# Altium PCB PCB_2020-11-19_18-02-21_2026-10-13.pcbdoc (part 1 of 2)
Units mm, origin at the board's own origin, x right, y up, seen from the top; angles counter-clockwise.
Board outline 104.82 x 112.39 mm, 2 copper layers (Top Layer, Bottom Layer); 188 components, 189 nets, 651 pads, 163 vias.
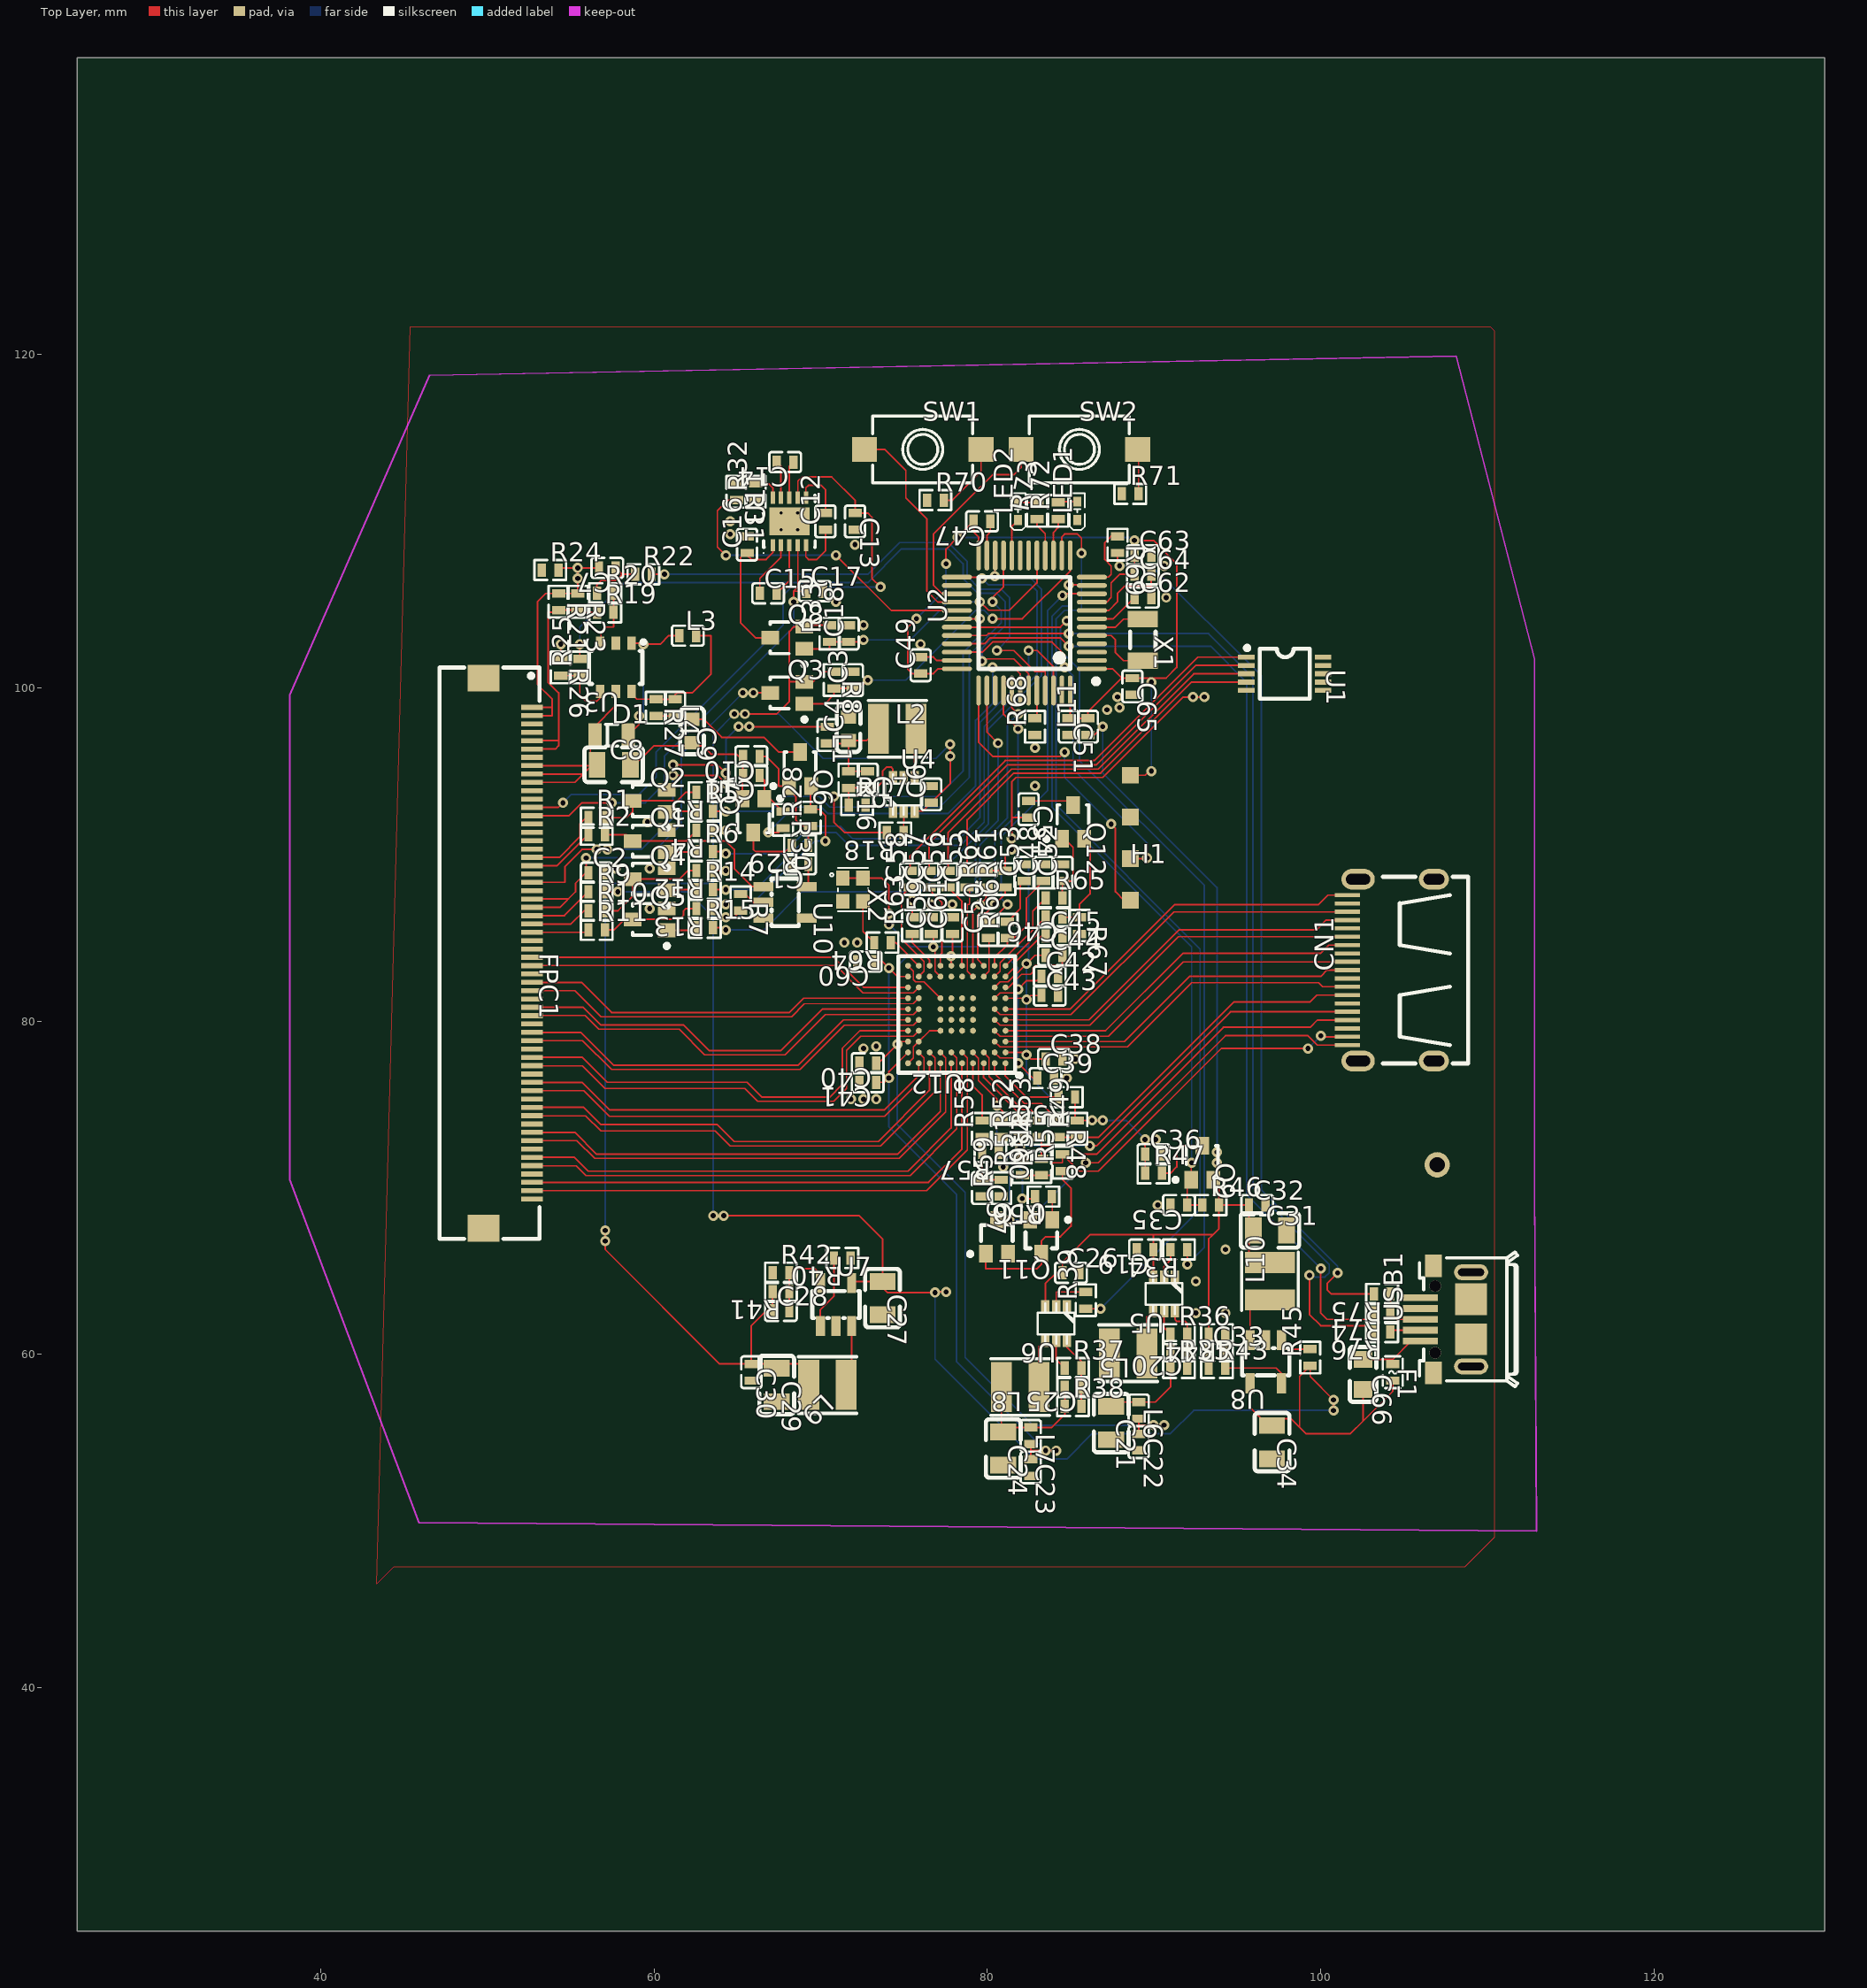
[diagram p0: Top Layer view]
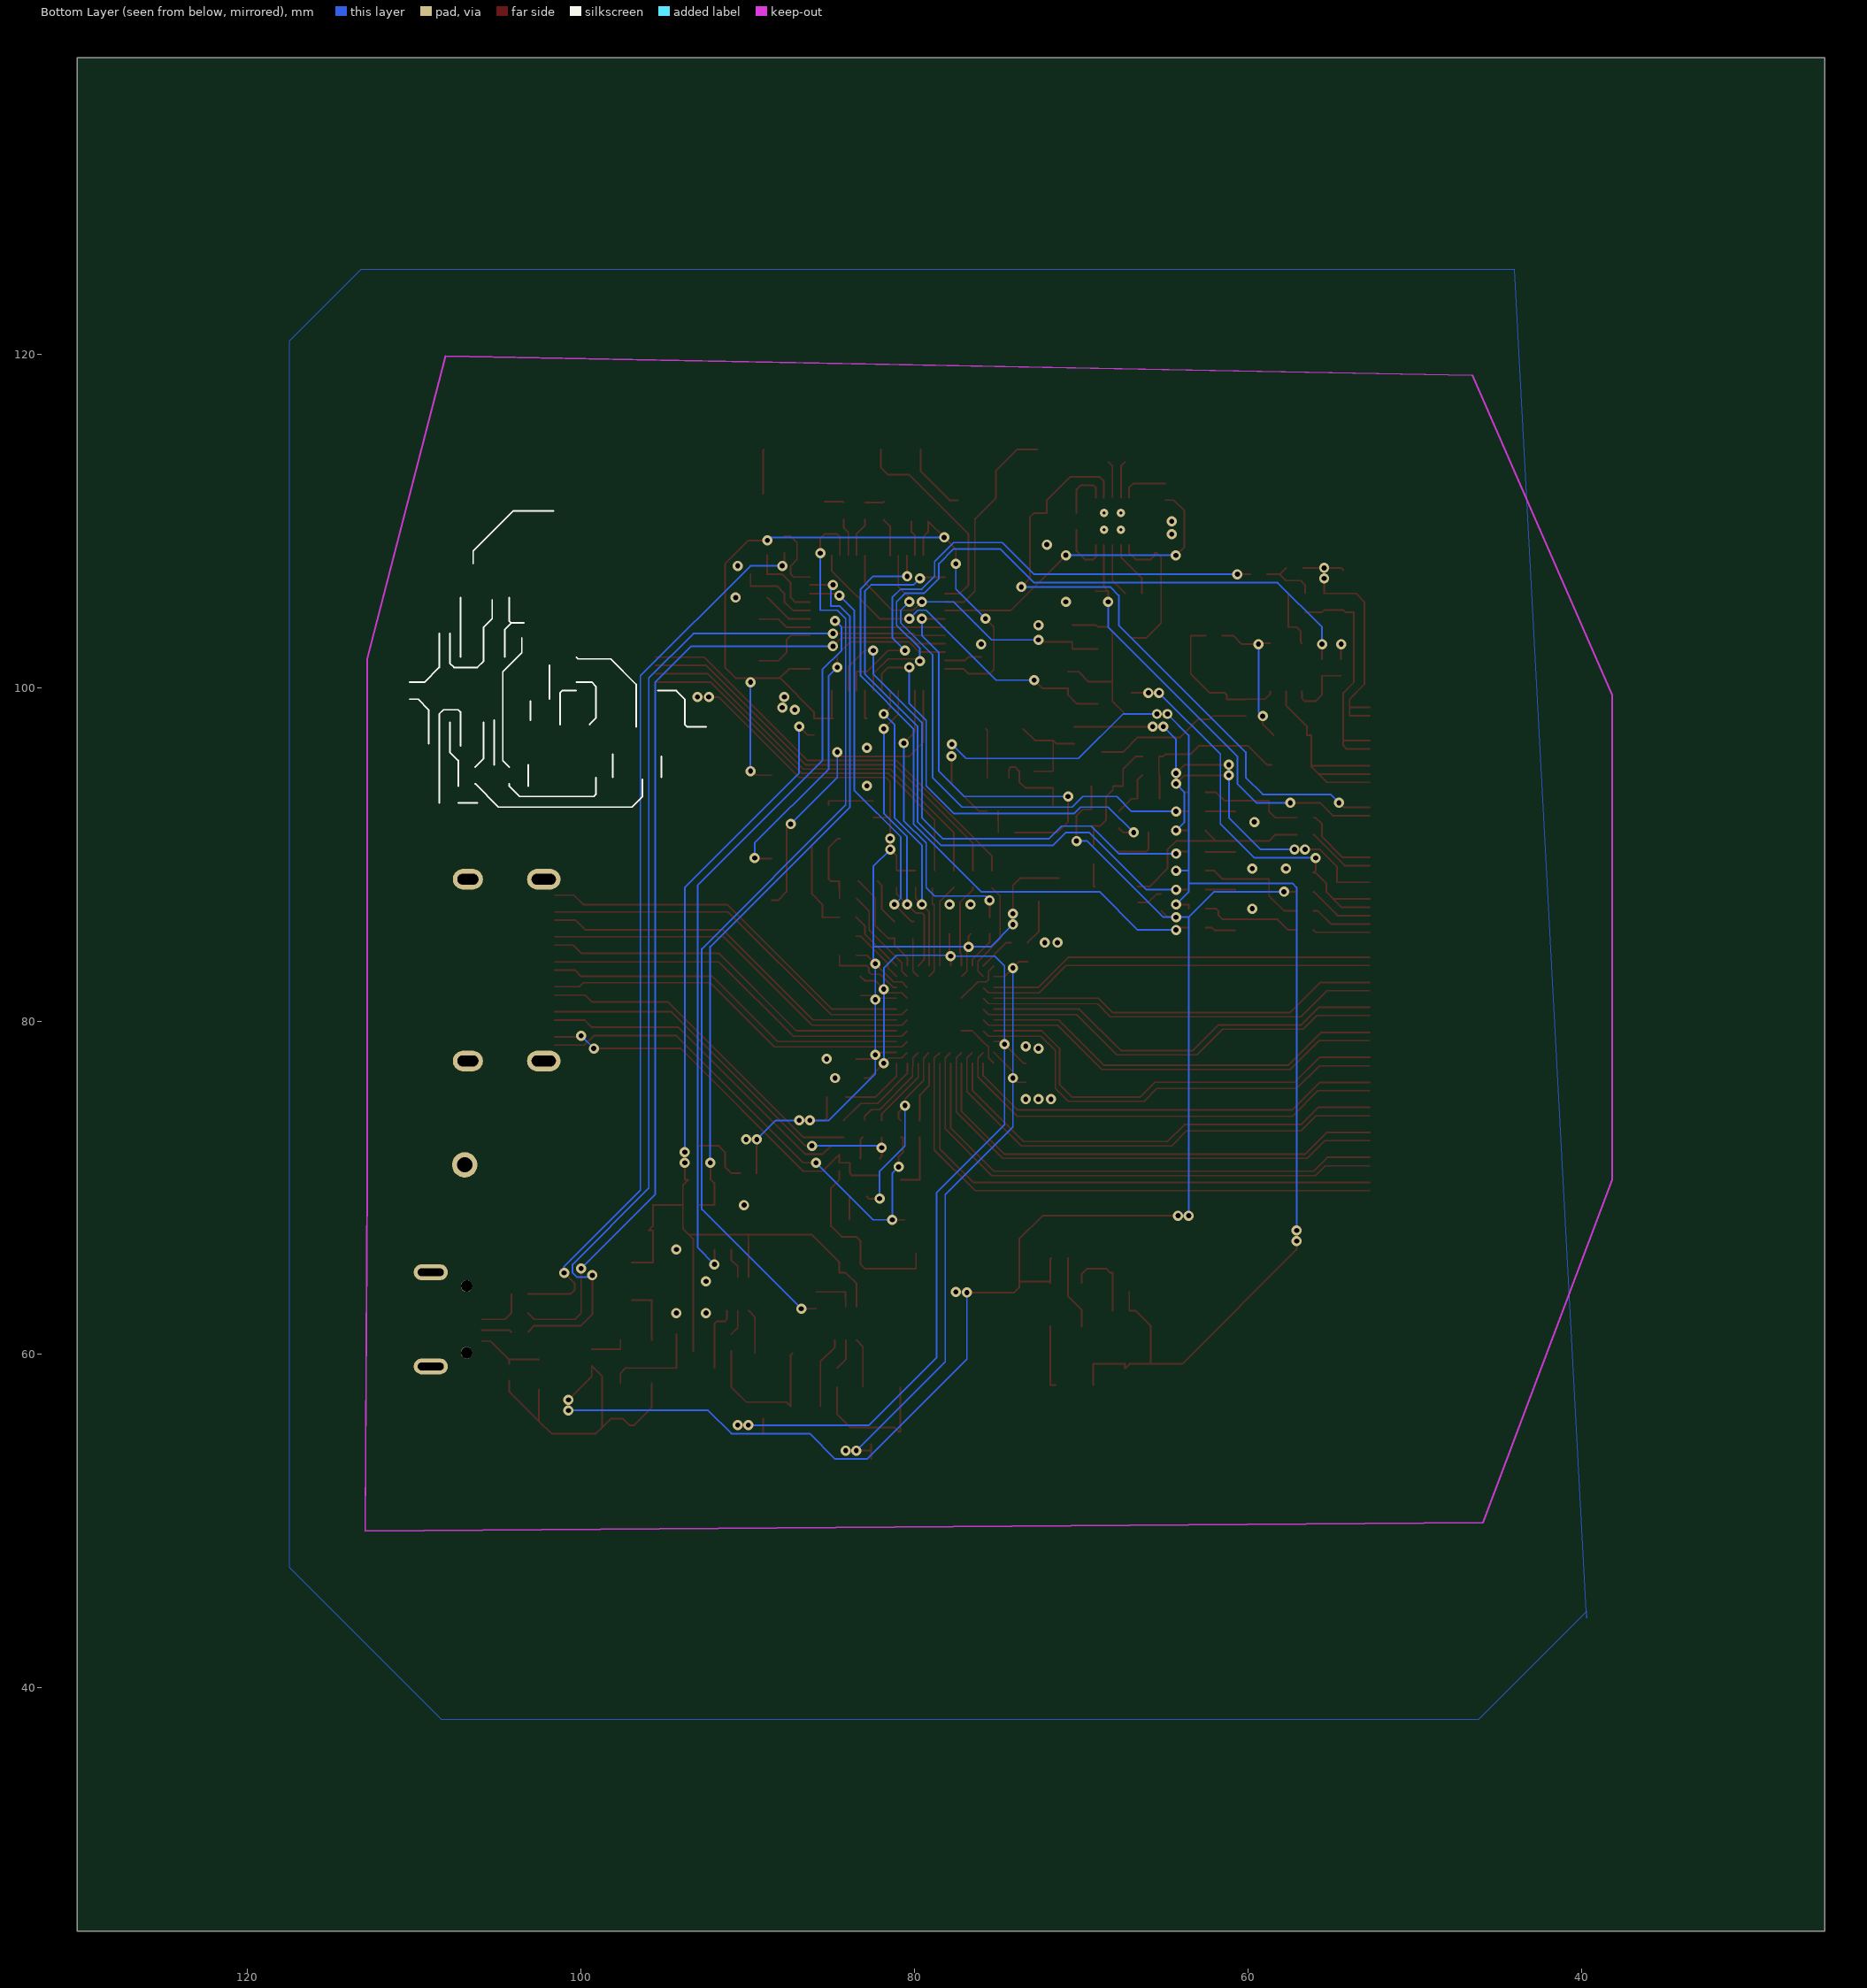
[diagram p1: Bottom Layer view, seen from below]

## Layer stack, top to bottom
Top Layer: signal copper (thickness not stored)
Dielectric: dielectric 0.32, FR-4, Dk 4.8
Bottom Layer: signal copper (thickness not stored)

## Board outline
130.225,25.4 25.4,25.4 25.4,137.795 130.225,137.795

## Components (designator, comment, footprint, x,y, rotation, side; value= is the part's Value field where it differs from the comment)
C1 "0.1u" C0402 68.757,89.408 r180 top
C2 "0.1u" C0402 56.565,88.9 r0 top
C3 "0.1u" C0402 71.932,100.457 r90 top
C4 "0.1u" C0603#1 71.678,97.536 r90 top
C5 "0.1u" C0402 72.821,94.488 r270 top
C6 "0.1u" C0402 76.631,93.599 r90 top
C7 "0.1u" C0402 57.2,107.188 r180 top
C8 "0.1u" C0805 57.581,95.377 r0 top
C9 "0.1u" C0603#1 62.281,97.409 r270 top
C10 "0.1u" C0402 65.836,95.885 r180 top
C11 "0.1u" C0402 65.836,94.742 r180 top
C12 "0.1u" C0402 70.281,109.982 r90 top
C13 "0.1u" C0402 72.059,109.982 r270 top
C14 "0.1u" C0402 67.868,113.538 r180 top
C15 "0.1u" C0402 66.852,105.664 r0 top
C16 "0.1u" C0402 65.582,108.585 r90 top
C17 "0.1u" C0402 69.646,105.791 r0 top
C18 "0.1u" C0402 71.678,103.251 r90 top
C19 "0.1u" C0402 89.458,66.294 r180 top
C20 "0.1u" C0402 91.49,60.198 r180 top
C21 "0.1u" C0805 87.426,55.88 r270 top
C22 "0.1u" C0402 89.077,54.737 r270 top
C23 "0.1u" C0402 82.6,53.213 r270 top
C24 "0.1u" C0805 80.949,54.356 r270 top
C25 "0.1u" C0402 85.14,58.039 r180 top
C26 "0.1u" C0402 85.013,64.897 r0 top
C27 "0.1u" C0805 73.71,63.373 r270 top
C28 "0.1u" C0402 67.614,62.611 r0 top
C29 "0.1u" C0805 67.36,58.166 r270 top
C30 "0.1u" C0402 65.836,58.928 r270 top
C31 "0.1u" C0805 96.951,67.437 r0 top
C32 "0.1u" C0402 96.189,68.961 r0 top
C33 "0.1u" C0402 93.776,60.198 r0 top
C34 "0.1u" C0805 97.078,54.737 r270 top
C35 "0.1u" C0402 91.49,68.961 r180 top
C36 "0.1u" C0402 89.966,72.009 r0 top
C37 "0.1u" C0402 79.679,69.977 r270 top
C38 "0.1u" C0402 83.997,77.724 r0 top
C39 "0.1u" C0402 83.489,76.581 r0 top
C40 "0.1u" C0402 72.821,77.47 r180 top
C41 "0.1u" C0402 72.821,76.327 r180 top
C42 "0.1u" C0402 83.743,82.677 r0 top
C43 "0.1u" C0402 83.743,81.534 r0 top
C44 "0.1u" C0402 83.997,83.947 r0 top
C45 "0.1u" C0402 83.997,85.09 r0 top
C46 "1000p" C0402 83.997,86.233 r180 top
C47 "0.1u" C0402 79.679,109.982 r180 top
C48 "1000p" C0402 83.362,88.9 r90 top
C49 "0.1u" C0402 75.996,101.346 r90 top
C50 "0.1u" C0402 80.06,85.471 r90 top
C51 "0.1u" C0402 84.886,97.663 r270 top
C52 "5p" C0402 84.505,88.9 r90 top
C53 "0.1u" C0402 82.219,88.9 r90 top
C54 "0.1u" C0402 82.473,92.71 r270 top
C55 "0.1u" C0402 78.79,88.519 r90 top
C56 "0.1u" C0402 77.647,88.519 r90 top
C57 "0.1u" C0402 76.504,88.519 r90 top
C58 "0.1u" C0402 75.361,88.519 r90 top
C59 "0.1u" C0402 76.631,85.725 r90 top
C60 "0.1u" C0402 72.694,83.566 r180 top
C61 "0.1u" C0402 77.901,85.725 r90 top
C62 "0.1u" C0402 89.331,105.41 r0 top
C63 "0.1u" C0402 89.331,107.95 r0 top
C64 "0.1u" C0402 89.331,106.807 r0 top
C65 "0.1u" C0402 88.696,100.076 r270 top
C66 "0.1u" C0603#2 102.539,58.801 r270 top
CN1 "128AA19CBCN" HDMI-SMD_128AA19CBCN 104.19,83.058 r90 top
D1 "1N4007W" SOD-106_L2.0-W1.3-RD 57.454,97.155 r0 top
F1 "CF04V3T4R0" F0402 104.317,58.928 r270 top
FPC1 "CF31601D0R0-05-NH" FPC-SMD_CF31601D0R0-05-NH 51.231,84.074 r270 top
H1 "HDR-F-2.54_2x2" "TEST PADS" 88.569,87.249 r0 top
L1 "1m" L0402 70.408,97.155 r270 top
L2 "1m" IND-SMD_L3.8-W3.8_SLF0302 74.599,97.536 r0 top
L3 "1m" L0402 62.026,103.124 r0 top
L4 "1m" L0402 61.264,98.806 r270 top
L5 "1m" IND-SMD_L3.8-W3.8_SLF0302 88.442,60.071 r180 top
L6 "1m" L0402 89.077,56.642 r270 top
L7 "1m" L0402 82.6,55.118 r270 top
L8 "1m" IND-SMD_L3.8-W3.8_SLF0302 81.965,58.039 r180 top
L9 "1m" IND-SMD_L3.8-W3.8_SLF0302 70.408,58.166 r180 top
L10 "1m" IND-SMD_L3.8-W3.8_SLF0302 96.951,64.389 r90 top
L11 "1m" L0402 86.029,97.663 r90 top
LED1 "FC-F1005UGK-520M5" LED0402-RD 85.394,110.617 r90 top
LED2 "FC-F1005UGK-520M5" LED0402-RD 81.838,110.617 r90 top
Q1 "MMST4401-7-F" SOT-323-3_L2.0-W1.3-P1.30-LS2.1-BR 59.74,90.805 r0 top
Q2 "MMST4401-7-F" SOT-323-3_L2.0-W1.3-P1.30-LS2.1-BR 59.74,93.218 r0 top
Q3 "MMST4401-7-F" SOT-323-3_L2.0-W1.3-P1.30-LS2.1-BR 67.995,99.695 r0 top
Q4 "MMST4401-7-F" SOT-323-3_L2.0-W1.3-P1.30-LS2.1-BR 59.74,88.519 r0 top
Q5 "MMST4401-7-F" SOT-323-3_L2.0-W1.3-P1.30-LS2.1-BR 59.74,86.106 r0 top
Q6 "MMST4401-7-F" SOT-323-3_L2.0-W1.3-P1.30-LS2.1-BR 68.757,95.123 r270 top
Q7 "MMST4401-7-F" SOT-323-3_L2.0-W1.3-P1.30-LS2.1-BR 65.963,92.329 r90 top
Q8 "MMST4401-7-F" SOT-323-3_L2.0-W1.3-P1.30-LS2.1-BR 67.995,102.997 r0 top
Q9 "MMST4401-7-F" SOT-323-3_L2.0-W1.3-P1.30-LS2.1-BR 92.887,71.501 r270 top
Q10 "BC857W 3F SOT-323" SOT-323-3_L2.2-W1.3-P1.30-LS2.1-BL 80.569,67.055 r0 top
Q11 "BC857W 3F SOT-323" SOT-323-3_L2.2-W1.3-P1.30-LS2.1-BL 83.235,67.056 r180 top
Q12 "2sc2712y" SOT-323-3_L2.0-W1.3-P1.30-LS2.1-BR 85.14,91.948 r270 top
R1 "1k" R0402 56.565,92.202 r0 top
R2 "1k" R0402 56.565,91.186 r0 top
R3 "1k" R0402 63.042,93.726 r180 top
R4 "1k" R0402 63.042,91.44 r180 top
R5 "1k" R0402 63.042,92.583 r0 top
R6 "1k" R0402 63.042,90.17 r0 top
R7 "1k" R0402 65.201,87.122 r270 top
R8 "1k" R0402 70.789,100.457 r270 top
R9 "1k" R0402 56.565,87.757 r0 top
R10 "1k" R0402 56.565,86.614 r0 top
R11 "1k" R0402 56.565,85.471 r0 top
R12 "1k" R0402 63.042,89.027 r180 top
R13 "1k" R0402 63.042,86.741 r180 top
R14 "1k" R0402 63.042,87.884 r0 top
R15 "1k" R0402 63.042,85.598 r0 top
R16 "1k" R0402 71.678,94.488 r270 top
R17 "1k" R0402 72.186,92.964 r0 top
R18 "1k" R0402 74.472,91.313 r180 top
R19 "1k" R0402 57.073,104.521 r0 top
R20 "1k" R0402 57.073,105.664 r0 top
R21 "1k" R0402 54.279,105.156 r270 top
R22 "1k" R0402 59.359,106.807 r0 top
R23 "1k" R0402 55.422,105.156 r270 top
R24 "1k" R0402 53.771,107.061 r0 top
R25 "1k" R0402 55.549,101.219 r90 top
R26 "1k" R0402 54.406,101.219 r270 top
R27 "1k" R0402 60.121,98.806 r270 top
R28 "1k" R0402 69.392,92.202 r90 top
R29 "1k" R0402 68.757,90.551 r180 top
R30 "1k" R0402 67.741,92.075 r270 top
R31 "1k" R0402 64.947,111.76 r270 top
R32 "1k" R0402 66.09,111.76 r90 top
R33 "1k" R0402 70.535,103.251 r90 top
R34 "1k" R0402 91.49,66.294 r180 top
R35 "1k" R0402 91.49,59.182 r0 top
R36 "1k" R0402 91.49,61.214 r0 top
R37 "1k" R0402 85.14,59.182 r0 top
R38 "1k" R0402 85.14,56.896 r0 top
R39 "1k" R0402 85.902,63.246 r90 top
R40 "1k" R0402 71.297,65.786 r180 top
R41 "1k" R0402 67.614,63.754 r180 top
R42 "1k" R0402 67.614,64.897 r0 top
R43 "1k" R0402 93.776,59.182 r0 top
R44 "1k" R0402 93.776,61.214 r180 top
R45 "1k" R0402 99.364,59.817 r90 top
R46 "1k" R0402 93.395,68.961 r0 top
R47 "1k" R0402 89.966,70.866 r0 top
R48 "1k" R0402 84.251,73.533 r270 top
R49 "1k" R0402 85.394,73.533 r90 top
R50 "1k" R0402 84.759,75.438 r180 top
R51 "1k" R0402 82.092,71.247 r90 top
R52 "1k" R0402 81.965,73.533 r90 top
R53 "1k" R0402 83.108,73.533 r90 top
R54 "1k" R0402 83.235,71.247 r90 top
R55 "1k" R0402 84.505,71.501 r90 top
R56 "1k" R0402 83.362,69.469 r180 top
R57 "1k" R0402 80.187,72.136 r180 top
R58 "1k" R0402 79.679,73.533 r90 top
R59 "1k" R0402 80.822,69.977 r90 top
R60 "1k" R0402 80.822,73.533 r270 top
R61 "1k" R0402 81.076,88.519 r90 top
R62 "1k" R0402 79.933,88.519 r90 top
R63 "1k" R0402 75.488,85.725 r90 top
R64 "1k" R0402 73.71,84.709 r180 top
R65 "1.5k" R0402 83.997,87.376 r0 top
R66 "1k" R0402 81.203,85.471 r90 top
R67 "1k" R0402 85.521,85.725 r270 top
R68 "1k" R0402 82.854,97.663 r90 top
R69 "1k" R0402 87.807,108.585 r270 top
R70 "1k" R0402 76.885,111.252 r0 top
R71 "1k" R0402 88.569,111.633 r0 top
R72 "1k" R0402 84.251,110.617 r90 top
R73 "1k" R0402 82.981,110.617 r90 top
R74 "1k" R0402 103.682,62.484 r180 top
R75 "1k" R0402 103.682,63.627 r180 top
R76 "1k" R0402 103.682,61.341 r180 top
SW1 "KSR251GLFS" KEY-SMD_2P-L6.0-W3.8-P7.30-L 76.123,114.3 r0 top
SW2 "KSR251GLFS" KEY-SMD_2P-L6.0-W3.8-P7.30-L 85.521,114.3 r0 top
U1 "CS4344-CZZ" TSSOP-10_L3.0-W3.0-P0.50-LS4.9-BL 97.84,100.838 r270 top
U2 "GD32F103C8T6" TQFP-48_L7.0-W7.0-P0.50-LS9.0-BL 82.219,103.886 r90 top
U3 "lps f57u1" SOT23-6_L3.1-W3.1-P0.95-BL 57.708,101.219 r180 top
U4 "lps f57u1" SOT-323-6L 74.98,93.599 r0 top
U5 "lps f57u1" SOT-323-6L 90.601,63.627 r180 top
U6 "lps f57u1" SOT-323-6L 84.124,61.849 r180 top
U7 "none" SOT23-5 70.916,62.992 r0 top
U8 "none" SOT23-5 96.697,59.563 r180 top
U10 "mh2322" SOT23-5 67.868,87.122 r270 top
U11 "none" LT-DD-10_V 68.122,109.982 r90 top
U12 "TC358870XBG" P-VFBGA-80_L7.0-W7.0-R10-C10-P0.65-TL 78.161,80.395 r180 top
USB1 "USB-CON-MICRO-B-5S" MICRO-USB-SMD_MICRO-5P5.9 107.492,62.103 r90 top
X1 "32.768KHz" FC-135R_L3.2-W1.5 89.331,102.87 r270 top
X2 "40MHz" OSC-SMD_4P-L2.0-W1.6-BL 71.932,87.884 r270 top

## Footprints (in the part's own frame and the unit in brackets; to place one, negate y for a bottom-side part, rotate by r counter-clockwise, add the part's x,y. Pads: shape width x height; smd on the part's side, far side on the other; paste and mask are expansions set on the pad)
C0402 [mm]
  rect 0.5x0.8 smd paste+0 mask+0.102: 1(-0.5,0) 2(0.5,0)
  silkscreen extent -0.95,-0.6 0.95,0.6
C0603#1 [mm]
  rect 0.8x0.9 smd paste+0 mask+0.102: 1(-0.7,0) 2(0.7,0)
  silkscreen extent -1.4,-0.7 1.4,0.72
C0603#2 [mm]
  rect 1x1.1 smd paste+0 mask+0.102: 1(-0.9,0) 2(0.9,0)
  silkscreen extent -1.65,-0.8 1.65,0.8
C0805 [mm]
  rect 1x1.55 smd paste+0 mask+0.102: 1(-1,0) 2(1,0)
  silkscreen extent -1.75,-1.04 1.75,1.04
F0402 [mm]
  rect 0.5x0.8 smd paste+0 mask+0.102: 1(-0.5,0) 2(0.5,0)
  silkscreen extent -0.95,-0.6 0.95,0.6
FC-135R_L3.2-W1.5 [mm]
  rect 1x1.8 smd paste+0 mask+0.102: 1(-1.25,0) 2(1.25,0)
  silkscreen extent -0.51,-0.76 0.51,0.76
FPC-SMD_CF31601D0R0-05-NH [mm]
  rect 0.3x1.3 smd paste+0 mask+0.08: 1(-14.75,1.45) 2(-14.25,1.45) 3(-13.75,1.45) 4(-13.25,1.45) 5(-12.75,1.45) 6(-12.25,1.45) 7(-11.75,1.45) 8(-11.25,1.45) 9(-10.75,1.45) 10(-10.25,1.45) 11(-9.75,1.45) 12(-9.25,1.45) 13(-8.75,1.45) 14(-8.25,1.45) 15(-7.75,1.45) 16(-7.25,1.45) 17(-6.75,1.45) 18(-6.25,1.45) 19(-5.75,1.45) 20(-5.25,1.45) 21(-4.75,1.45) 22(-4.25,1.45) 23(-3.75,1.45) 24(-3.25,1.45) 25(-2.75,1.45) 26(-2.25,1.45) 27(-1.75,1.45) 28(-1.25,1.45) 29(-0.75,1.45) 30(-0.25,1.45) 31(0.25,1.45) 32(0.75,1.45) 33(1.25,1.45) 34(1.75,1.45) 35(2.25,1.45) 36(2.75,1.45) 37(3.25,1.45) 38(3.75,1.45) 39(4.25,1.45) 40(4.75,1.45) 41(5.25,1.45) 42(5.75,1.45) 43(6.25,1.45) 44(6.75,1.45) 45(7.25,1.45) 46(7.75,1.45) 47(8.25,1.45) 48(8.75,1.45) 49(9.25,1.45) 50(9.75,1.45) 51(10.25,1.45) 52(10.75,1.45) 53(11.25,1.45) 54(11.75,1.45) 55(12.25,1.45) 56(12.75,1.45) 57(13.25,1.45) 58(13.75,1.45) 59(14.25,1.45) 60(14.75,1.45)
  rect 1.6x1.9 smd paste+0 mask+0.102: 61(16.5,-1.45) 62(-16.5,-1.45)
  silkscreen extent -17.14,-4.09 17.14,1.91
HDMI-SMD_128AA19CBCN [mm]
  rect 0.25x1.5 smd paste+0 mask+0.102: 1(4.5,2.6) 2(4,2.6) 3(3.5,2.6) 4(3,2.6) 5(2.5,2.6) 6(2,2.6) 7(1.5,2.6) 8(1,2.6) 9(0.5,2.6) 10(0,2.6) 11(-0.5,2.6) 12(-1,2.6) 13(-1.5,2.6) 14(-2,2.6) 15(-2.5,2.6) 16(-3,2.6) 17(-3.5,2.6) 18(-4,2.6) 19(-4.5,2.6)
  oval 1.25x2 hole 0.65 slot 1.45 at 90 deg paste+0 mask+0.102: 20(-5.45,1.95) 23(5.45,1.95)
  oval 1.25x1.8 hole 0.65 slot 1.25 at 90 deg paste+0 mask+0.102: 21(-5.45,-2.6) 22(5.45,-2.6)
  silkscreen extent -5.6,-4.65 5.6,0.45
IND-SMD_L3.8-W3.8_SLF0302 [mm]
  rect 1.25x3 smd paste+0 mask+0.102: 1(-1.125,0) 2(1.125,0)
  silkscreen extent -1.75,-1.7 1.75,1.7
KEY-SMD_2P-L6.0-W3.8-P7.30-L [mm]
  rect 1.5x1.5 smd paste+0 mask+0.102: 1(-3.5,0) 2(3.5,0)
  silkscreen extent -3,-2 3,2
L0402 [mm]
  rect 0.5x0.8 smd paste+0 mask+0.102: 1(-0.5,0) 2(0.5,0)
  silkscreen extent -0.95,-0.6 0.95,0.6
LED0402-RD [mm]
  rect 0.6x0.5 smd paste+0 mask+0.102: 1(-0.55,0) 2(0.55,0)
  silkscreen extent -1.15,-0.45 1.05,0.45
LT-DD-10_V [mil]
  rect 28.5x10.5 smd paste+0 mask+4: 1(-56,39) 2(-56,20) 3(-56,0) 4(-56,-20) 5(-56,-39) 6(56,-39) 7(56,-20) 8(56,0) 9(56,20) 10(56,39)
  rect 65.5x94.5 smd paste+0 mask+4: 11(0,0)
  silkscreen extent -75,-61 61,61
MICRO-USB-SMD_MICRO-5P5.9 [mm]
  rect 0.4x2.1 smd paste+0 mask+0.102: 1(-1.3,1.525) 2(-0.65,1.525) 3(0,1.525) 4(0.65,1.525) 5(1.3,1.525)
  oval 0.95x2.05 hole 0.45 slot 1.55 at 90 deg paste+0 mask+0.102: SH1(-2.824,-1.525) SH4(2.826,-1.525)
  rect 1.35x1 smd paste+0 mask+0.102: SH2(-3.2,0.725) SH5(3.2,0.725)
  rect 1.9x1.9 smd paste+0 mask+0.102: SH3(-1.2,-1.525) SH6(1.2,-1.525)
  round 0.7 hole 0.7 unplated paste+0: ""(-2,0.625) ""(2,0.625)
  silkscreen extent -4.04,-4.31 4.04,1.57
OSC-SMD_4P-L2.0-W1.6-BL [mm]
  rect 0.9x0.8 smd paste+0 mask+0.102: 1(-0.7,-0.6) 2(0.7,-0.6) 3(0.7,0.6) 4(-0.7,0.6)
  silkscreen extent -1.3,-1.37 1.3,0.9
P-VFBGA-80_L7.0-W7.0-R10-C10-P0.65-TL [mm]
  round 0.35 smd paste+0 mask+0.102: A1(-2.925,2.925) A2(-2.275,2.925) A3(-1.625,2.925) A4(-0.975,2.925) A5(-0.325,2.925) A6(0.325,2.925) A7(0.975,2.925) A8(1.625,2.925) A9(2.275,2.925) A10(2.925,2.925) B1(-2.925,2.275) B2(-2.275,2.275) B3(-1.625,2.275) B4(-0.975,2.275) B5(-0.325,2.275) B6(0.325,2.275) B7(0.975,2.275) B8(1.625,2.275) B9(2.275,2.275) B10(2.925,2.275) C1(-2.925,1.625) C2(-2.275,1.625) C9(2.275,1.625) C10(2.925,1.625) D1(-2.925,0.975) D2(-2.275,0.975) D4(-0.975,0.975) D5(-0.325,0.975) D6(0.325,0.975) D7(0.975,0.975) D9(2.275,0.975) D10(2.925,0.975) E1(-2.925,0.325) E2(-2.275,0.325) E4(-0.975,0.325) E5(-0.325,0.325) E6(0.325,0.325) E7(0.975,0.325) E9(2.275,0.325) E10(2.925,0.325) F1(-2.925,-0.325) F2(-2.275,-0.325) F4(-0.975,-0.325) F5(-0.325,-0.325) F6(0.325,-0.325) F7(0.975,-0.325) F9(2.275,-0.325) F10(2.925,-0.325) G1(-2.925,-0.975) G2(-2.275,-0.975) G4(-0.975,-0.975) G5(-0.325,-0.975) G6(0.325,-0.975) G7(0.975,-0.975) G9(2.275,-0.975) G10(2.925,-0.975) H1(-2.925,-1.625) H2(-2.275,-1.625) H9(2.275,-1.625) H10(2.925,-1.625) J1(-2.925,-2.275) J2(-2.275,-2.275) J3(-1.625,-2.275) J4(-0.975,-2.275) J5(-0.325,-2.275) J6(0.325,-2.275) J7(0.975,-2.275) J8(1.625,-2.275) J9(2.275,-2.275) J10(2.925,-2.275) K1(-2.925,-2.925) K2(-2.275,-2.925) K3(-1.625,-2.925) K4(-0.975,-2.925) K5(-0.325,-2.925) K6(0.325,-2.925) K7(0.975,-2.925) K8(1.625,-2.925) K9(2.275,-2.925) K10(2.925,-2.925)
  silkscreen extent -3.88,-3.5 3.5,3.79
R0402 [mm]
  rect 0.5x0.8 smd paste+0 mask+0.102: 1(-0.5,0) 2(0.5,0)
  silkscreen extent -0.95,-0.6 0.95,0.6
SOD-106_L2.0-W1.3-RD [mm]
  rect 0.8x1.4 smd paste+0 mask+0.102: 1(-1,0) 2(1,0)
  silkscreen extent -0.37,-0.65 0.37,0.65
SOT23-5 [mil]
  rect 21.7x47.2 smd paste+0 mask+4: 1(-37,-51) 2(0,-51) 3(37,-51) 4(37,51) 5(-37,51)
  silkscreen extent -56,-32 56,32
SOT23-6_L3.1-W3.1-P0.95-BL [mil]
  rect 20.1x31.5 smd paste+0 mask+4: 1(-37.4,-57) 2(0,-57) 3(37.4,-57) 4(37.4,57) 5(0,57) 6(-37.4,57)
  silkscreen extent -69,-64 63,39
SOT-323-3_L2.0-W1.3-P1.30-LS2.1-BR [mil]
  rect 41.5x32.5 smd paste+0 mask+4: 1(40,-26) 2(40,26) 3(-40,0)
  silkscreen extent -40,-68 45,37
SOT-323-3_L2.2-W1.3-P1.30-LS2.1-BL [mil]
  rect 32.5x41.5 smd paste+0 mask+4: 1(-26,-40) 2(26,-40) 3(0,40)
  silkscreen extent -68,-45 37,28
SOT-323-6L [mil]
  rect 19.7x31.5 smd paste+0 mask+4: 1(-25.6,-39.4) 2(0,-39.4) 3(25.6,-39.4) 4(25.65,39.35) 5(0.05,39.35) 6(-25.54,39.35)
  silkscreen extent -44,-48 44,48
"TEST PADS" [mm]
  rect 1x1 smd paste+0 mask+0.102: 1(0,0) 2(0,2.5) 3(0,5) 4(0,7.5)
TQFP-48_L7.0-W7.0-P0.50-LS9.0-BL [mm]
  oval 0.28x1.8 smd paste+0 mask+0.102: 1(-2.75,-4.05) 2(-2.25,-4.05) 3(-1.75,-4.05) 4(-1.25,-4.05) 5(-0.75,-4.05) 6(-0.25,-4.05) 7(0.25,-4.05) 8(0.75,-4.05) 9(1.25,-4.05) 10(1.75,-4.05) 11(2.25,-4.05) 12(2.75,-4.05) 25(2.75,4.05) 26(2.25,4.05) 27(1.75,4.05) 28(1.25,4.05) 29(0.75,4.05) 30(0.25,4.05) 31(-0.25,4.05) 32(-0.75,4.05) 33(-1.25,4.05) 34(-1.75,4.05) 35(-2.25,4.05) 36(-2.75,4.05)
  oval 1.8x0.28 smd paste+0 mask+0.102: 13(4.05,-2.75) 14(4.05,-2.25) 15(4.05,-1.75) 16(4.05,-1.25) 17(4.05,-0.75) 18(4.05,-0.25) 19(4.05,0.25) 20(4.05,0.75) 21(4.05,1.25) 22(4.05,1.75) 23(4.05,2.25) 24(4.05,2.75) 37(-4.05,2.75) 38(-4.05,2.25) 39(-4.05,1.75) 40(-4.05,1.25) 41(-4.05,0.75) 42(-4.05,0.25) 43(-4.05,-0.25) 44(-4.05,-0.75) 45(-4.05,-1.25) 46(-4.05,-1.75) 47(-4.05,-2.25) 48(-4.05,-2.75)
  silkscreen extent -3.65,-4.45 2.75,2.75
TSSOP-10_L3.0-W3.0-P0.50-LS4.9-BL [mm]
  rect 0.3x1 smd paste+0 mask+0.102: 1(-1,-2.3) 2(-0.5,-2.3) 3(0,-2.3) 4(0.5,-2.3) 5(1,-2.3) 6(1,2.3) 7(0.5,2.3) 8(0,2.3) 9(-0.5,2.3) 10(-1,2.3)
  silkscreen extent -1.68,-2.39 1.5,1.5

## Free pads (board coordinates)
  round 1.524 hole 0.914 paste+0 mask+0.102: 1(106.984,71.374)

## Via types
v1: diameter 0.61, hole 0.305, Top Layer to Bottom Layer, tented both sides, 159 vias
v2: diameter 0.5, hole 0.201, Top Layer to Bottom Layer, tented both sides, 4 vias

## Nets (pads, with @x,y where several pads share a name; then routed paths per layer and width w, separated by ;. In a path a pad name is that pad's centre, name@x,y a point inside that pad or via, vN(x,y) a via of type N, cw(c..) or ccw(c..) an arc to the next point about the centre after c; other vN are vias at no path point)
0CLK+: FPC1.37 U12.F10 | length 24.6
  Top Layer w0.1: FPC1.37@52.681,80.824 55.751,80.824 56.819,79.756 61.772,79.756 63.296,78.232 67.614,78.232 70.101,80.719 U12.F10@75.226,80.719
0CLK-: FPC1.38 U12.F9 | length 25.3
  Top Layer w0.07: FPC1.38@52.681,80.324 55.87,80.324 56.692,79.502 61.518,79.502 63.042,77.978 67.868,77.978 70.283,80.394 75.549,80.394 U12.F9@75.877,80.721
0D0+: FPC1.31 U12.H10 | length 23.3
  Top Layer w0.1: FPC1.31@52.681,83.824 70.785,83.824 72.59,82.019 U12.H10@75.226,82.019
0D0-: FPC1.32 U12.H9 | length 24
  Top Layer w0.07: FPC1.32@52.681,83.324 70.904,83.324 72.534,81.694 75.549,81.694 U12.H9@75.877,82.019
0D1+: FPC1.34 U12.G10 | length 23.6
  Top Layer w0.1: FPC1.34@52.681,82.324 55.648,82.324 57.454,80.518 68.122,80.518 68.973,81.369 U12.G10@75.226,81.369
0D1-: FPC1.35 U12.G9 | length 24.3
  Top Layer w0.07: FPC1.35@52.681,81.824 55.259,81.824 56.819,80.264 68.249,80.264 69.008,81.023 75.549,81.044 U12.G9@75.877,81.369
0D2+: FPC1.40 U12.E10 | length 24.5
  Top Layer w0.1: FPC1.40@52.681,79.324 55.6,79.324 57.581,77.343 68.63,77.343 71.358,80.071 U12.E10@75.226,80.071
0D2-: FPC1.41 U12.E9 | length 25.1
  Top Layer w0.07: FPC1.41@52.681,78.824 55.719,78.824 57.454,77.089 68.757,77.089 71.411,79.743 75.549,79.743 U12.E9@75.877,80.071
0D3+: FPC1.43 U12.D10 | length 26.4
  Top Layer w0.1: FPC1.43@52.681,77.824 55.703,77.824 57.2,76.327 65.582,76.327 66.471,75.438 70.535,75.438 71.297,76.2 71.297,78.359 72.359,79.421 U12.D10@75.226,79.421
0D3-: FPC1.44 U12.D9 | length 27.2
  Top Layer w0.07: FPC1.44@52.681,77.324 55.695,77.324 57.073,75.946 65.455,75.946 66.217,75.184 70.789,75.184 71.551,75.946 71.551,78.232 72.412,79.093 75.549,79.093 U12.D9@75.877,79.421
1CLK+: FPC1.52 U12.A7 | length 29
  Top Layer w0.1: FPC1.52@52.681,73.324 55.25,73.324 56.565,72.009 74.599,72.009 77.177,74.587 U12.A7@77.177,77.47
1CLK-: FPC1.53 U12.B7 | length 30.1
  Top Layer w0.07: FPC1.53@52.681,72.824 55.369,72.824 56.438,71.755 74.701,71.755 77.497,74.554 77.497,77.798 U12.B7@77.177,78.12
1D0+: FPC1.46 U12.A9 | length 25.5
  Top Layer w0.1: FPC1.46@52.681,76.324 55.679,76.324 57.327,74.676 73.837,74.676 75.877,76.716 U12.A9@75.877,77.47
1D0-: FPC1.47 U12.B9 | length 26.7
  Top Layer w0.07: FPC1.47@52.681,75.824 55.798,75.824 57.327,74.295 73.837,74.295 76.197,76.657 76.197,77.798 U12.B9@75.877,78.12
1D1+: FPC1.49 U12.A8 | length 27.6
  Top Layer w0.1: FPC1.49@52.681,74.824 55.782,74.824 56.819,73.787 63.804,73.787 64.82,72.771 73.456,72.771 76.527,75.842 U12.A8@76.527,77.47
1D1-: FPC1.50 U12.B8 | length 28.7
  Top Layer w0.07: FPC1.50@52.681,74.324 55.901,74.324 56.819,73.406 63.677,73.406 64.566,72.517 73.583,72.517 76.847,75.781 76.847,77.798 U12.B8@76.527,78.12
1D2+: FPC1.55 U12.A6 | length 30.4
  Top Layer w0.1: FPC1.55@52.681,71.824 55.226,71.824 56.057,70.993 75.234,70.993 77.827,73.586 U12.A6@77.827,77.47
1D2-: FPC1.56 U12.B6 | length 31.6
  Top Layer w0.07: FPC1.56@52.681,71.324 55.345,71.324 55.93,70.739 75.361,70.739 78.157,73.536 78.157,77.787 U12.B6@77.827,78.12
1D3+: FPC1.58 U12.A5 | length 31.8
  Top Layer w0.1: FPC1.58@52.681,70.324 76.471,70.325 78.475,72.329 U12.A5@78.475,77.47
1D3-: FPC1.59 U12.B5 | length 33.1
  Top Layer w0.07: FPC1.59@52.681,69.824 76.352,69.825 78.808,72.281 78.808,77.787 U12.B5@78.475,78.12
3.3V: C19.1 C26.1 C31.1 C32.1 C33.1 L10.2 L11.1 Q9.2 R44.2 R46.2 U5.3 U6.3 | length 64.5
  Top Layer w0.1: U6.3@83.474,62.85 83.474,64.247 84.124,64.897 C26.1@84.513,64.897 ; C26.1@84.513,64.897 84.505,65.532 86.156,67.183 93.522,67.183 ; L11.1@86.029,97.163 86.418,97.163 v1(86.918,97.663) ; U5.3@89.951,64.628 C19.1@89.958,66.294 89.963,67.183 ; C33.1@93.276,60.198 R44.2@93.276,61.214 93.276,66.937 93.522,67.183 ; v1(93.776,72.136) v1(93.776,71.501) 93.776,70.485 Q9.2@93.547,70.485 93.895,70.137 R46.2@93.895,68.961 ; C32.1@95.689,68.961 95.689,67.699 C31.1@95.951,67.437 95.681,67.437 95.681,65.514 L10.2@96.951,65.514 ; C32.1@95.689,68.961 R46.2@93.895,68.961 ; 93.522,67.183 93.895,67.556 R46.2@93.895,68.961
  Bottom Layer w0.1: v1(86.918,97.663) 86.918,94.869 93.776,88.011 v1(93.776,72.136)
3.3V2: C47.2 C49.1 C51.1 C65.1 H1.4 L11.2 U2.1 U2.24 U2.36 U2.48 | length 55.3
  Top Layer w0.1: v1(75.742,104.14) 75.234,103.632 75.234,101.092 75.48,100.846 C49.1@75.996,100.846 76.766,100.846 77.055,101.135 U2.36@78.17,101.135 ; v1(77.52,107.442) 77.52,108.323 v1(78.217,109.02) C47.2@79.179,109.982 ; C47.2@79.179,109.982 79.179,109.339 79.468,109.05 U2.24@79.468,107.937 ; U2.48@84.97,99.835 84.97,98.163 C51.1@84.886,98.163 L11.2@86.029,98.163 86.029,98.552 88.053,100.576 C65.1@88.696,100.576 ; U2.1@86.269,101.136 87.51,101.135 88.069,100.576 C65.1@88.696,100.576 ; H1.4@88.569,94.749 89.465,94.749 v1@89.712,94.996 ; v1(88.823,108.839) 89.966,108.839 91.363,107.442 91.363,101.219 90.728,100.584 89.839,100.584 v1(89.839,100.33) 89.839,100.576 C65.1@88.696,100.576
  Bottom Layer w0.1: v1(75.742,104.14) 77.52,105.918 v1(77.52,107.442) ; v1(78.217,109.02) 88.642,109.02 v1(88.823,108.839) ; v1(89.839,94.996) v1(89.839,100.33)
3.3V3: C16.1 Q8.3 U11.1 | length 9
  Top Layer w0.1: Q8.3@66.979,102.997 66.09,102.997 65.201,103.886 65.201,107.823 65.463,108.085 C16.1@65.582,108.085 65.582,107.95 65.836,107.696 66.725,107.696 67.131,108.102 U11.1@67.131,108.56
+5V: C27.1 C34.1 C66.2 F1.2 Q6.2 R7.2 R9.2 R28.2 R40.1 R45.1 U7.4 U8.4 | length 113.7
  Top Layer w0.1: R9.2@57.065,87.757 v1(57.835,87.757) ; v1(63.55,68.326) v1(64.185,68.326) 72.313,68.326 73.71,66.929 C27.1@73.71,64.373 71.941,64.373 U7.4@71.856,64.287 71.856,65.727 R40.1@71.797,65.786 ; v1(64.312,86.233) 64.812,86.233 R7.2@65.201,86.622 ; Q6.2@69.417,94.107 69.392,94.082 R28.2@69.392,92.702 69.908,92.702 70.281,92.329 v1(70.281,90.805) ; C27.1@73.71,64.373 73.71,64.008 74.005,63.713 v1@76.857,63.713 ; v1(76.856,63.714) 76.896,63.754 v1(77.52,63.754) ; U8.4@95.757,58.268 95.757,56.82 96.839,55.738 C34.1@97.078,55.737 97.474,56.134 98.221,56.134 98.729,55.626 ; v1(100.761,56.642) v1(100.761,57.277) 99.364,58.674 R45.1@99.364,59.317 98.729,58.682 98.729,55.626 ; C66.2@102.539,57.901 102.539,56.007 ; F1.2@104.317,58.428 104.317,57.785 102.539,56.007 ; 98.729,55.626 99.11,55.245 101.777,55.245 102.539,56.007
  Bottom Layer w0.1: v1(57.835,87.757) 62.026,87.757 63.55,86.233 ; v1(64.185,68.326) v1(63.55,68.326) 63.55,86.233 ; v1(70.281,90.805) 69.646,90.805 65.074,86.233 v1(64.312,86.233) 63.55,86.233 ; v1@76.857,63.713 76.857,59.718 82.854,53.721 84.759,53.721 86.283,55.245 90.982,55.245 92.379,56.642 v1(100.761,56.642)
A: R5.2 U2.21 | length 31.3
  Top Layer w0.1: R5.2@63.542,92.583 v1(64.312,92.583) ; v1(80.314,105.156) 80.314,105.41 80.969,106.065 U2.21@80.969,107.936
  Bottom Layer w0.1: v1(64.312,92.583) 66.979,92.583 67.868,93.472 69.9,93.472 70.535,92.837 77.139,92.837 78.917,94.615 78.917,101.981 80.822,103.886 80.822,104.648 v1(80.314,105.156)
A_OSCK: C55.2 U1.4 | length 23.2
  Top Layer w0.1: C55.2@78.79,89.019 78.79,92.075 81.584,94.869 86.791,94.869 92.26,100.338 U1.4@95.54,100.338
A_SCK: C57.2 U1.2 | length 25.1
  Top Layer w0.1: C57.2@76.504,89.019 76.504,90.678 81.203,95.377 86.537,95.377 92.498,101.338 U1.2@95.54,101.338
A_SD0: C58.2 U1.1 | length 26
  Top Layer w0.1: C58.2@75.361,89.019 75.361,89.916 81.076,95.631 86.41,95.631 92.617,101.838 U1.1@95.54,101.838
A_WFS: C56.2 U1.3 | length 24.1
  Top Layer w0.1: C56.2@77.647,89.019 77.647,91.313 81.457,95.123 86.664,95.123 92.379,100.838 U1.3@95.54,100.838
B: R6.2 U2.46 | length 32.1
  Top Layer w0.1: R6.2@63.542,90.17 64.185,90.17 v1(64.312,90.043) ; v1(82.473,102.235) 82.981,102.235 83.969,101.247 U2.46@83.969,99.835
  Bottom Layer w0.1: v1(64.312,90.043) 67.741,90.043 69.392,91.694 71.17,91.694 71.932,90.932 78.282,90.932 79.552,92.202 79.552,97.917 82.473,100.838 v1(82.473,102.235)
BIASDA: C45.1 U12.J1 | length 3.6
  Top Layer w0.1: U12.J1@81.086,82.67 81.584,83.167 81.584,83.439 83.235,85.09 C45.1@83.497,85.09
C: R14.2 U2.25 | length 38.9
  Top Layer w0.1: R14.2@63.542,87.884 v1(64.312,87.884) ; U2.25@78.169,106.636 79.596,106.636 v1(79.679,106.553)
  Bottom Layer w0.1: v1(64.312,87.884) 66.09,87.884 69.519,91.313 70.916,91.313 71.678,90.551 78.409,90.551 79.806,91.948 79.806,97.663 82.981,100.838 82.981,105.791 82.6,106.172 80.06,106.172 v1(79.679,106.553)
C1_1: C1.1 U10.5 | length 1.4
  Top Layer w0.1: U10.5@69.163,88.062 69.257,88.062 C1.1@69.257,89.408
C2_1: C2.1 FPC1.24 FPC1.25 Q3.3 | length 25.3
  Top Layer w0.1: FPC1.25@52.681,86.824 54.362,86.824 55.295,87.757 55.295,88.265 55.93,88.9 C2.1@56.065,88.9 55.93,89.035 v1(55.93,89.789) ; FPC1.24@52.681,87.324 54.883,87.324 ; v1(65.328,99.695) v1(65.963,99.695) Q3.3@66.979,99.695
  Bottom Layer w0.1: v1(55.93,89.789) 59.613,89.789 61.645,91.821 61.645,96.012 v1(65.328,99.695)
C7_1: C7.1 R20.1 R22.1 | length 3.6
  Top Layer w0.1: R20.1@56.573,105.664 56.565,106.172 56.819,106.426 57.708,106.426 58.089,106.807 ; C7.1@57.7,107.188 58.089,106.807 ; R22.1@58.859,106.807 58.089,106.807
C12_1: C12.1 U11.5 | length 3.4
  Top Layer w0.1: U11.5@69.113,108.56 69.113,107.848 69.265,107.696 69.773,107.696 70.281,108.204 C12.1@70.281,109.482
C12_2: C12.2 U11.6 | length 3.3
  Top Layer w0.1: U11.6@69.113,111.404 69.113,111.989 69.265,112.141 70.027,112.141 70.281,111.887 C12.2@70.281,110.482
C14_1: C14.1 U11.8 | length 2.2
  Top Layer w0.1: U11.8@68.122,111.404 68.122,113.292 C14.1@68.368,113.538
C14_2: C14.2 U11.9 | length 2.2
  Top Layer w0.1: C14.2@67.368,113.538 67.614,113.292 U11.9@67.614,111.404
C15_1: C15.1 U11.2 | length 3.4
  Top Layer w0.1: C15.1@66.352,105.664 66.352,106.561 67.614,107.823 U11.2@67.614,108.56
C15_2: C15.2 U11.3 | length 3.2
  Top Layer w0.1: C15.2@67.352,105.664 68.122,106.434 U11.3@68.122,108.56
C33_2: C33.2 R43.2 R44.1 U8.5 | length 6.1
  Top Layer w0.1: R44.1@94.276,61.214 C33.2@94.276,60.198 94.276,59.182 97.332,59.182 97.637,58.877 U8.5@97.637,58.268
C37_1: C37.1 R57.2 R58.1 R59.2 | length 3.7
  Top Layer w0.1: R58.1@79.679,73.033 R57.2@79.687,72.136 C37.1@79.679,70.477 R59.2@80.822,70.477
C50_1: C50.1 U12.J3 | length 2.4
  Top Layer w0.07: U12.J3@79.776,82.669 80.098,82.992 C50.1@80.098,84.963
C54_1: C54.1 Q12.3 | length 2.9
  Top Layer w0.1: C54.1@82.473,93.21 85.14,93.21 Q12.3@85.14,92.964
C55_1: C55.1 U12.J4 | length 5.6
  Top Layer w0.07: C55.1@78.917,88.011 78.917,86.995 78.808,86.995 78.808,82.987 U12.J4@79.125,82.669
C56_1: C56.1 U12.K5 | length 5
  Top Layer w0.1: C56.1@77.647,88.019 78.475,87.191 U12.K5@78.475,83.32
C57_1: C57.1 U12.K7 | length 5.1
  Top Layer w0.1: C57.1@76.504,88.019 76.504,87.884 77.266,87.122 77.266,84.074 77.177,83.985 U12.K7@77.177,83.32
C58_1: C58.1 U12.J9 | length 6.2
  Top Layer w0.07: C58.1@75.361,88.019 74.853,87.511 74.853,84.917 76.197,83.574 76.197,82.992 U12.J9@75.877,82.669
CEC: R48.1 U12.A2 | length 5.6
  Top Layer w0.1: U12.A2@80.426,77.47 80.426,77.018 80.426,76.85 82.219,75.057 83.227,75.057 R48.1@84.251,74.033
CLK1: U2.5 X1.2 | length 4.1
  Top Layer w0.1: U2.5@86.269,103.136 87.414,103.136 87.68,102.87 87.68,102.108 88.168,101.62 X1.2@89.331,101.62
CLK2: U2.6 X1.1 | length 3.3
  Top Layer w0.1: U2.6@86.269,103.636 87.685,103.637 88.168,104.12 X1.1@89.331,104.12
CLK+: CN1.10 U12.C1 | length 22.3
  Top Layer w0.1: U12.C1@81.076,78.77 88.218,78.77 92.125,82.677 99.999,82.677 100.38,83.058 CN1.10@101.59,83.058
CLK-: CN1.12 U12.C2 | length 23
  Top Layer w0.07: U12.C2@80.426,78.77 80.753,78.443 88.399,78.443 92.252,82.296 99.872,82.296 100.111,82.057 CN1.12@101.59,82.058
CN1_13: CN1.13 R48.2 R49.1 | length 20.9
  Top Layer w0.1: R48.2@84.251,73.033 R49.1@85.394,73.033 86.672,73.033 94.792,81.153 99.364,81.153 99.769,81.558 CN1.13@101.59,81.558
CN1_15: CN1.15 R51.2 R52.1 | length 24.3
  Top Layer w0.1: R52.1@81.965,73.033 v1(81.965,72.4) 81.965,71.874 R51.2@82.092,71.747 ; v1(86.156,72.517) 86.537,72.517 94.579,80.559 CN1.15@101.59,80.558
  Bottom Layer w0.1: v1(81.965,72.4) 82.082,72.517 v1(86.156,72.517)
CN1_16: CN1.16 R53.1 R54.2 | length 23.2
  Top Layer w0.1: R53.1@83.108,73.033 83.235,72.906 R54.2@83.235,71.747 ; 83.235,72.518 85.012,72.518 85.521,72.009 86.537,72.009 94.157,79.629 99.364,79.629 99.793,80.058 CN1.16@101.59,80.058
D: R15.2 U2.22 | length 39
  Top Layer w0.1: R15.2@63.542,85.598 64.185,85.598 v1(64.312,85.471) ; v1(80.441,106.68) 80.441,107.908 U2.22@80.469,107.936
  Bottom Layer w0.1: v1(64.312,85.471) 66.598,85.471 68.884,87.757 75.996,87.757 80.06,91.821 80.06,97.536 83.235,100.711 83.235,105.918 82.473,106.68 v1(80.441,106.68)
D0+: CN1.7 U12.D1 | length 22.6
  Top Layer w0.1: U12.D1@81.076,79.421 87.091,79.421 91.744,84.074 99.999,84.074 100.484,84.559 CN1.7@101.59,84.558
D0-: CN1.9 U12.D2 | length 23.1
  Top Layer w0.07: U12.D2@80.426,79.421 80.753,79.093 87.271,79.093 91.736,83.558 CN1.9@101.59,83.558
D1+: CN1.4 U12.E1 | length 23
  Top Layer w0.1: U12.E1@81.076,80.071 86.09,80.071 91.49,85.471 99.745,85.471 100.332,86.058 CN1.4@101.59,86.058
D1-: CN1.6 U12.E2 | length 23.5
  Top Layer w0.07: U12.E2@80.426,80.071 80.753,79.743 86.143,79.743 91.457,85.057 CN1.6@101.59,85.058
D2+: CN1.1 U12.F1 | length 23.3
  Top Layer w0.1: U12.F1@81.076,80.719 84.96,80.719 91.236,86.995 99.872,86.995 100.436,87.559 CN1.1@101.59,87.558
D2-: CN1.3 U12.F2 | length 23.9
  Top Layer w0.07: U12.F2@80.426,80.719 80.753,80.394 85.016,80.394 91.18,86.558 CN1.3@101.59,86.558
DAOUT: R65.1 U12.J2 | length 6
  Top Layer w0.07: U12.J2@80.426,82.669 80.748,82.992 80.748,83.492 82.727,85.471 82.727,86.606 R65.1@83.497,87.376
DDC_SCL: R52.2 U12.A3 | length 4.3
  Top Layer w0.1: U12.A3@79.776,77.47 79.776,76.611 81.965,74.422 R52.2@81.965,74.041
DDC_SDA: R53.2 U12.B3 | length 5.7
  Top Layer w0.07: U12.B3@79.776,78.12 80.098,77.798 80.106,76.662 82.092,74.676 82.6,74.676 82.981,74.295 R53.2@82.981,74.041
DET: CN1.19 Q10.3 R57.1 R60.2 | length 31.2
  Top Layer w0.1: Q10.3@80.569,68.071 v1(81.33,68.072) ; R60.2@80.822,73.033 80.687,73.033 R57.1@80.687,72.136 80.949,71.874 v1(80.949,71.247) ; v1(85.902,71.501) 86.664,71.501 94.284,79.121 99.237,79.121 99.8,78.558 CN1.19@101.59,78.558
  Bottom Layer w0.1: v1(80.949,71.247) 81.33,70.866 v1(81.33,68.072) 82.473,68.072 v1(85.902,71.501)
DISP18: FPC1.22 L1.1 R3.1 R4.1 | length 35.9
  Top Layer w0.1: FPC1.22@52.681,88.324 54.66,88.323 54.66,89.281 55.676,90.297 v1(56.565,90.297) v1(57.2,90.297) ; R4.1@63.542,91.44 v1(64.312,91.44) ; R3.1@63.542,93.726 63.804,93.726 v1(64.312,94.234) ; v1(65.074,97.663) v1(65.709,97.663) 65.717,97.655 L1.1@70.408,97.655 ; v1(64.312,94.234) v1(64.312,94.869) 63.804,95.377 v1(61.137,95.377) v1(61.137,94.742) 63.804,94.742 v1(64.312,94.234)
  Bottom Layer w0.1: v1(57.2,90.297) 59.232,90.297 61.137,92.202 v1(61.137,94.742) v1(61.137,95.377) ; v1(64.312,91.44) 63.804,91.948 63.804,93.726 v1(64.312,94.234) v1(64.312,94.869) 64.312,96.901 v1(65.074,97.663)